# Altium PCB PCI Express_16765X6890_64PIN_Low profile.PCBDOC (part 2 of 5)
Units mm, origin at the board's own origin, x right, y up, seen from the top; angles counter-clockwise.
Board outline 167.65 x 68.9 mm, 6 copper layers (TopLayer, AGround_Layer, InternalPlane1, Power_Layer, Ground_Layer, BottomLayer), stack 1.141 mm thick; 897 components, 648 nets, 2942 pads, 321 vias.
Unrouted connection lines stored in the file: 1996.
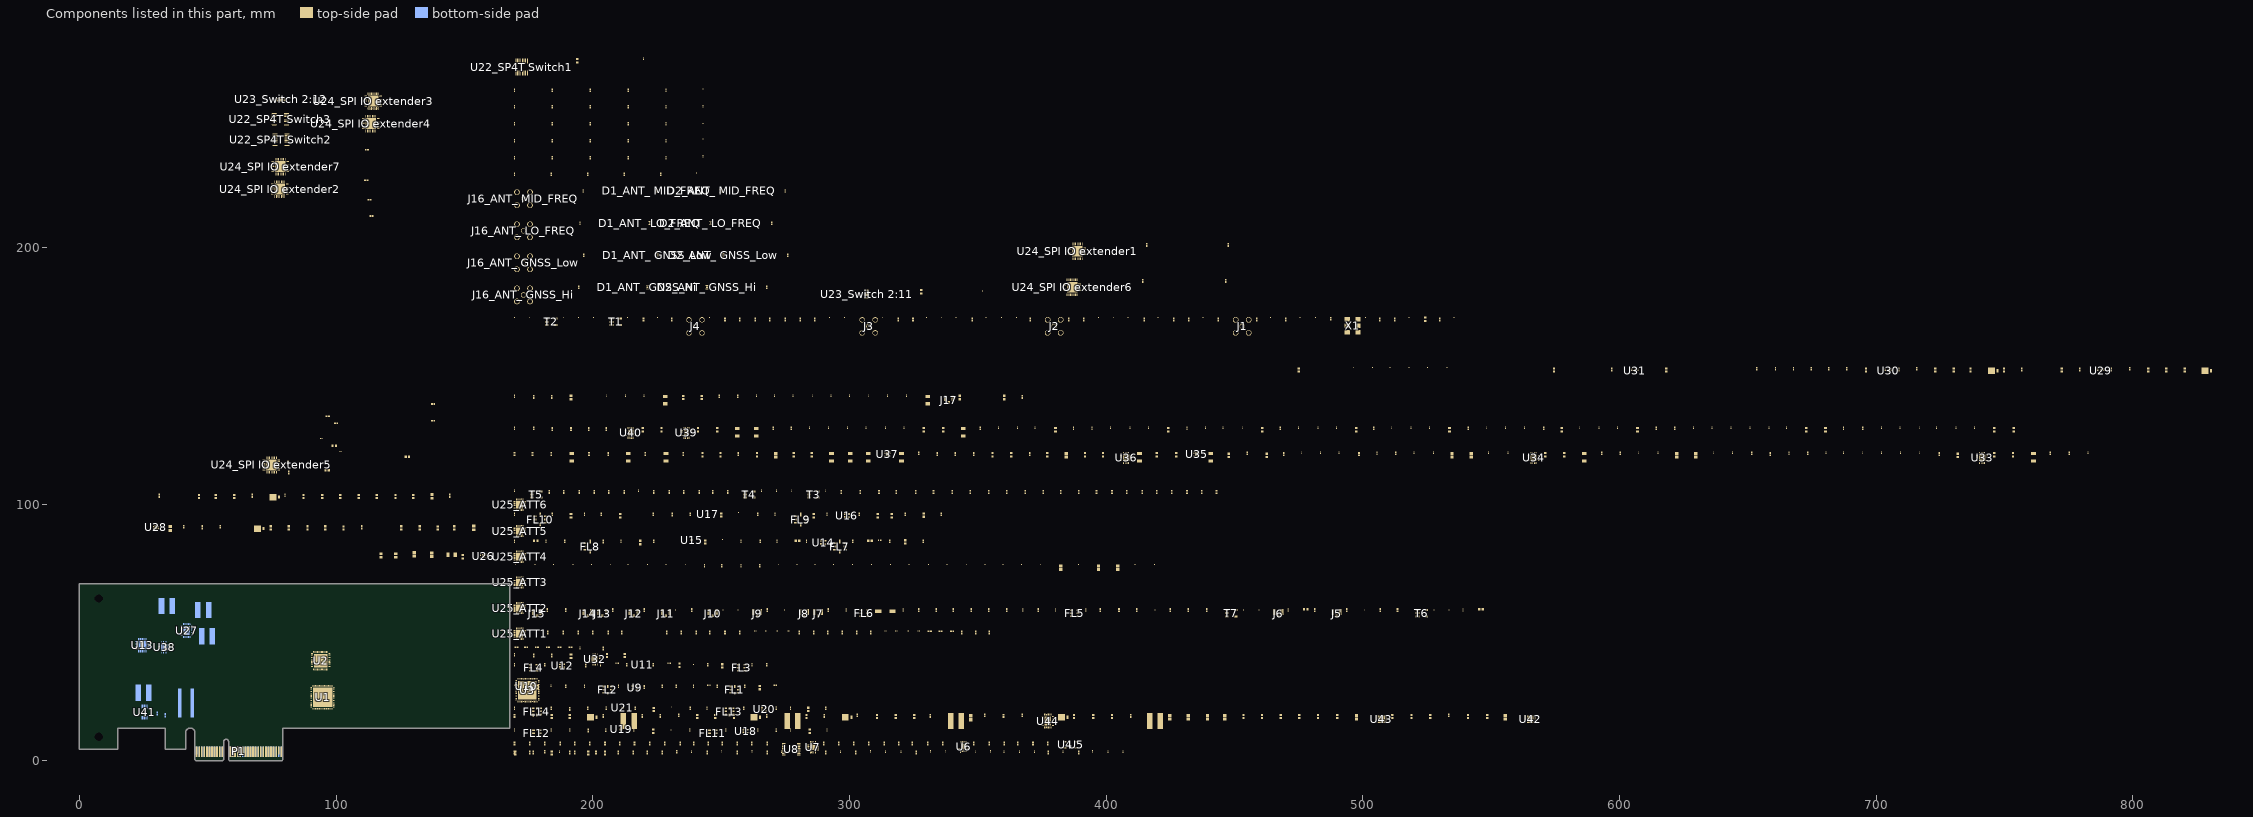
[diagram p4: the components of this part, seen from the top]

## Components (designator, comment, footprint, x,y, rotation, side; value= is the part's Value field where it differs from the comment) (continued)
C284 "10µF" "CAP 0805/2012 RF" 542.249,119 r90 top
C285 "0.1µF" "CAP 0201/0603 RF" 548.999,120 r90 top
C286 "0.1µF" "CAP 0201/0603 RF" 556.499,120 r90 top
C287 "10µF" "CAP 0402/1005 RF" 505.499,119.75 r90 top
C288 "10µF" "CAP 0402/1005 RF" 512.749,119.75 r90 top
C289 "0.1µF" "CAP 0201/0603 RF" 475.999,120 r90 top
C290 "0.1µF" "CAP 0201/0603 RF" 483.499,120 r90 top
C291 "0.1µF" "CAP 0201/0603 RF" 490.749,120 r90 top
C292 "4.7µF" "CAP 0603/1608" 462.499,119 r90 top
C293 "1nF" "CAP 0402/1005 RF" 454.999,119.75 r90 top
C294 "4.7µF" "CAP 0603/1608" 447.749,119 r90 top
C295 "4.7µF" "CAP 0603/1608 RF" 419.749,119.25 r90 top
C296 "4.7µF" "CAP 0603/1608 RF" 427.249,119.25 r90 top
C297 "4.7 µF" "CAP 0603/1608 RF" 355.749,119.25 r90 top
C298 "2200pF" "CAP 0603/1608 RF" 362.999,119.25 r90 top
C299 "1µF" "CAP 0603/1608 RF" 376.999,119.25 r90 top
C300 "10µF" "CAP 0805/2012 RF" 384.499,119 r90 top
C301 "4.7µF" "CAP 0603/1608 RF" 391.749,119.25 r90 top
C302 "4.7µF" "CAP 0603/1608 RF" 398.749,119.25 r90 top
C303 "1nF" "CAP 0402/1005 RF" 326.999,119.75 r90 top
C304 "4.7 µF" "CAP 0603/1608 RF" 242.749,119.25 r90 top
C305 "2200pF" "CAP 0603/1608 RF" 249.749,119.25 r90 top
C306 "1µF" "CAP 0603/1608 RF" 263.999,119.25 r90 top
C307 "10µF" "CAP 0805/2012 RF" 271.249,119 r90 top
C308 "4.7µF" "CAP 0603/1608 RF" 278.249,119.25 r90 top
C309 "4.7µF" "CAP 0603/1608 RF" 285.249,119.25 r90 top
C310 "2.2µF" "CAP 0603/1608" 360.249,141.5 r90 top
C311 "2.2µF" "CAP 0603/1608" 342.999,141.5 r90 top
C312 "0.1µF" "CAP 0201/0603 RF" 263.749,142.25 r90 top
C313 "0.1µF" "CAP 0201/0603 RF" 270.749,142.25 r90 top
C314 "0.1µF" "CAP 0201/0603 RF" 277.999,142.25 r90 top
C315 "0.1µF" "CAP 0201/0603 RF" 285.499,142.25 r90 top
C316 "0.1µF" "CAP 0201/0603 RF" 292.749,142.25 r90 top
C317 "0.1µF" "CAP 0201/0603 RF" 299.999,142.25 r90 top
C318 "0.1µF" "CAP 0201/0603 RF" 307.499,142.25 r90 top
C319 "0.1µF" "CAP 0201/0603 RF" 314.749,142.25 r90 top
C320 "0.1µF" "CAP 0201/0603 RF" 322.249,142.25 r90 top
C321 "4.7µF" "CAP 0603/1608 RF" 235.249,141.5 r90 top
C322 "4.7µF" "CAP 0603/1608 RF" 242.499,141.5 r90 top
C323 "10µF" "CAP 0402/1005 RF" 249.249,142 r90 top
C324 "10µF" "CAP 0402/1005 RF" 256.499,142 r90 top
C325 "0.1µF" "CAP 0201/0603 RF" 205.249,142.25 r90 top
C326 "0.1µF" "CAP 0201/0603 RF" 212.749,142.25 r90 top
C327 "0.1µF" "CAP 0201/0603 RF" 219.999,142.25 r90 top
C328 "4.7µF" "CAP 0603/1608" 191.499,141.5 r90 top
C329 "1nF" "CAP 0402/1005 RF" 169.499,142 r90 top
C330 "0.1µF" "CAP 0201/0603 RF" 701.998,129.75 r90 top
C331 "0.1µF" "CAP 0201/0603 RF" 709.248,129.75 r90 top
C332 "0.1µF" "CAP 0201/0603 RF" 716.748,129.75 r90 top
C333 "0.1µF" "CAP 0201/0603 RF" 723.498,129.75 r90 top
C334 "0.1µF" "CAP 0201/0603 RF" 730.998,129.75 r90 top
C335 "0.1µF" "CAP 0201/0603 RF" 738.248,129.75 r90 top
C336 "10µF" "CAP 0402/1005 RF" 687.248,129.5 r90 top
C337 "10µF" "CAP 0402/1005 RF" 694.748,129.5 r90 top
C338 "0.1µF" "CAP 0201/0603 RF" 628.749,129.75 r90 top
C339 "0.1µF" "CAP 0201/0603 RF" 635.999,129.75 r90 top
C340 "0.1µF" "CAP 0201/0603 RF" 643.499,129.75 r90 top
C341 "0.1µF" "CAP 0201/0603 RF" 650.748,129.75 r90 top
C342 "0.1µF" "CAP 0201/0603 RF" 658.248,129.75 r90 top
C343 "0.1µF" "CAP 0201/0603 RF" 664.998,129.75 r90 top
C344 "10µF" "CAP 0402/1005 RF" 614.249,129.5 r90 top
C345 "10µF" "CAP 0402/1005 RF" 621.499,129.5 r90 top
C346 "0.1µF" "CAP 0201/0603 RF" 584.499,129.75 r90 top
C347 "0.1µF" "CAP 0201/0603 RF" 591.999,129.75 r90 top
C348 "0.1µF" "CAP 0201/0603 RF" 599.249,129.75 r90 top
C349 "0.1µF" "CAP 0201/0603 RF" 548.249,129.75 r90 top
C350 "0.1µF" "CAP 0201/0603 RF" 555.499,129.75 r90 top
C351 "0.1µF" "CAP 0201/0603 RF" 562.999,129.75 r90 top
C352 "10µF" "CAP 0402/1005 RF" 570.499,129.5 r90 top
C353 "10µF" "CAP 0402/1005 RF" 540.999,129.5 r90 top
C354 "0.1µF" "CAP 0201/0603 RF" 511.249,129.75 r90 top
C355 "0.1µF" "CAP 0201/0603 RF" 518.749,129.75 r90 top
C356 "0.1µF" "CAP 0201/0603 RF" 525.999,129.75 r90 top
C357 "10µF" "CAP 0402/1005 RF" 504.249,129.5 r90 top
C358 "0.1µF" "CAP 0201/0603 RF" 474.999,129.75 r90 top
C359 "0.1µF" "CAP 0201/0603 RF" 482.499,129.75 r90 top
C360 "0.1µF" "CAP 0201/0603 RF" 489.749,129.75 r90 top
C361 "10µF" "CAP 0402/1005 RF" 467.749,129.5 r90 top
C362 "0.1µF" "CAP 0201/0603 RF" 438.749,129.75 r90 top
C363 "0.1µF" "CAP 0201/0603 RF" 445.499,129.75 r90 top
C364 "0.1µF" "CAP 0201/0603 RF" 452.999,129.75 r90 top
C365 "10µF" "CAP 0402/1005 RF" 431.499,129.5 r90 top
C366 "0.1µF" "CAP 0201/0603 RF" 401.749,129.75 r90 top
C367 "0.1µF" "CAP 0201/0603 RF" 409.249,129.75 r90 top
C368 "0.1µF" "CAP 0201/0603 RF" 416.499,129.75 r90 top
C369 "10µF" "CAP 0402/1005 RF" 387.249,129.5 r90 top
C370 "100pF" "CAP 0402/1005 RF" 394.499,129.5 r90 top
C371 "0.1µF" "CAP 0201/0603 RF" 357.999,129.75 r90 top
C372 "0.1µF" "CAP 0201/0603 RF" 365.499,129.75 r90 top
C373 "0.1µF" "CAP 0201/0603 RF" 372.249,129.75 r90 top
C374 "10µF" "CAP 0402/1005 RF" 350.999,129.5 r90 top
C375 "0.1µF" "CAP 0201/0603 RF" 306.499,129.75 r90 top
C376 "0.1µF" "CAP 0201/0603 RF" 313.999,129.75 r90 top
C377 "0.1µF" "CAP 0201/0603 RF" 321.249,129.75 r90 top
C378 "10µF" "CAP 0402/1005 RF" 277.249,129.5 r90 top
C379 "0.1µF" "CAP 0201/0603 RF" 284.499,129.75 r90 top
C380 "0.1µF" "CAP 0201/0603 RF" 291.749,129.75 r90 top
C381 "0.1µF" "CAP 0201/0603 RF" 299.249,129.75 r90 top
C382 "10µF" "CAP 0402/1005 RF" 270.249,129.5 r90 top
C383 "4.7µF" "CAP 0603/1608 RF" 240.999,129 r90 top
C384 "4.7µF" "CAP 0603/1608 RF" 248.499,129 r90 top
C385 "4.7µF" "CAP 0603/1608 RF" 219.499,129 r90 top
C386 "4.7µF" "CAP 0603/1608 RF" 226.749,129 r90 top
C387 "1nF" "CAP 0402/1005 RF" 176.999,129.5 r90 top
C388 "1nF" "CAP 0402/1005 RF" 169.499,129.5 r90 top
C389 "4.7 µF" "CAP 0603/1608 RF" 526.249,17.25 r90 top
C390 "1.5nF" "CAP 0402/1005 RF" 533.499,17.75 r90 top
C391 "4.7 µF" "CAP 0603/1608 RF" 548.499,17.25 r90 top
C392 "10µF" "CAP 0805/2012 RF" 555.499,17 r90 top
C393 "0.01µF" "CAP 0603/1608 RF" 511.499,17.25 r90 top
C394 "4.7 µF" "CAP 0603/1608 RF" 467.999,17.25 r90 top
C395 "680pF" "CAP 0603/1608 RF" 475.249,17.25 r90 top
C396 "1µF" "CAP 0603/1608 RF" 489.999,17.25 r90 top
C397 "10µF" "CAP 0805/2012 RF" 497.499,17 r90 top
C398 "0.01µF" "CAP 0603/1608 RF" 453.499,17.25 r90 top
C399 "4.7µF" "CAP 0805/2012 RF" 424.749,17 r90 top
C400 "4.7µF" "CAP 0805/2012 RF" 431.999,17 r90 top
C401 "4.7µF" "CAP 0805/2012 RF" 439.499,17 r90 top
C402 "4.7µF" "CAP 0805/2012 RF" 446.249,17 r90 top
C403 "4.7 µF" "CAP 0603/1608 RF" 387.499,17.25 r90 top
C404 "4.7 µF" "CAP 0603/1608 RF" 394.999,17.25 r90 top
C405 "4.7 µF" "CAP 0603/1608 RF" 402.249,17.25 r90 top
C406 "22pF" "CAP 0402/1005 RF" 367.249,17.75 r90 top
C407 "1µF" "CAP 0402/1005 RF" 352.749,17.75 r90 top
C408 "22pF" "CAP 0402/1005 RF" 302.999,17.75 r90 top
C409 "4.7 µF" "CAP 0603/1608 RF" 310.749,17.25 r90 top
C410 "4.7 µF" "CAP 0603/1608 RF" 317.999,17.25 r90 top
C411 "4.7 µF" "CAP 0603/1608 RF" 325.249,17.25 r90 top
C412 "50nF" "CAP 0603/1608 RF" 283.249,17.25 r90 top
C413 "22pF" "CAP 0402/1005 RF" 233.499,17.75 r90 top
C414 "4.7 µF" "CAP 0603/1608 RF" 240.749,17.25 r90 top
C415 "4.7 µF" "CAP 0603/1608 RF" 247.749,17.25 r90 top
C416 "4.7 µF" "CAP 0603/1608 RF" 254.999,17.25 r90 top
C417 "22pF" "CAP 0402/1005 RF" 176.749,17.75 r90 top
C418 "4.7 µF" "CAP 0603/1608 RF" 183.999,17.25 r90 top
C419 "4.7 µF" "CAP 0603/1608 RF" 190.999,17.25 r90 top
Conn1 "PCIE" "RES 0402/1005 RF" 203.999,43.75 r90 top
Conn2 "FMC" "RES 0201/0603" 194.999,44 r90 top
"D1_ANT_ GNSS_Hi" "MADP-011029-14150T" ODS-1415 221.249,184.499 r90 top (schematic designator D1)
"D1_ANT_ GNSS_Low" "MADP-011029-14150T" ODS-1415 225.249,196.999 r90 top (schematic designator D1)
"D1_ANT_ LO_FREQ" "MADP-011029-14150T" ODS-1415 222.249,209.499 r90 top (schematic designator D1)
"D1_ANT_ MID_FREQ" "MADP-011029-14150T" ODS-1415 224.749,221.999 r90 top (schematic designator D1)
"D2_ANT_ GNSS_Hi" "MADL-011021-14150T" ODS-1415 244.499,184.499 r90 top (schematic designator D2)
"D2_ANT_ GNSS_Low" "MADL-011021-14150T" ODS-1415 250.749,196.999 r90 top (schematic designator D2)
"D2_ANT_ LO_FREQ" "MADL-011021-14150T" ODS-1415 245.999,209.499 r90 top (schematic designator D2)
"D2_ANT_ MID_FREQ" "MADL-011021-14150T" ODS-1415 249.999,221.999 r90 top (schematic designator D2)
D3 "MBRM140T3" "CASE 457" 71.075,90.499 r0 top
D4 "MBRM140T3" "CASE 457" 77.075,102.749 r0 top
D5 "MBRM140T3" "CASE 457" 829.748,151.999 r0 top
D6 "MBRM140T3" "CASE 457" 746.498,151.999 r0 top
D7 "MBRM140T3" "CASE 457" 384.249,17 r0 top
D8 "MBRM140T3" "CASE 457" 299.999,17 r0 top
D9 "MBRM140T3" "CASE 457" 264.499,17 r0 top
D10 "MBRM140T3" "CASE 457" 200.749,17 r0 top
FB1 "120Ohm" "FER 0402/1005" 442.999,104.75 r90 top
FB2 "120Ohm" "FER 0402/1005" 431.499,104.75 r90 top
FB3 "120Ohm" "FER 0402/1005" 437.249,104.75 r90 top
FB4 "120Ohm" "FER 0402/1005" 419.749,104.75 r90 top
FB5 "120Ohm" "FER 0402/1005" 425.499,104.75 r90 top
FB6 "120Ohm" "FER 0402/1005" 413.999,104.75 r90 top
FB7 "120Ohm" "FER 0402/1005" 407.999,104.75 r90 top
FB8 "120Ohm" "FER 0402/1005" 402.249,104.75 r90 top
FB9 "120Ohm" "FER 0402/1005" 396.249,104.75 r90 top
FB10 "120Ohm" "FER 0402/1005" 389.249,104.75 r90 top
FB11 "120Ohm" "FER 0402/1005" 375.499,104.75 r90 top
FB12 "120Ohm" "FER 0402/1005" 382.249,104.75 r90 top
FB13 "120Ohm" "FER 0402/1005" 361.249,104.75 r90 top
FB14 "120Ohm" "FER 0402/1005" 368.499,104.75 r90 top
FB15 "120Ohm" "FER 0402/1005" 354.249,104.75 r90 top
FB16 "120Ohm" "FER 0402/1005" 346.999,104.75 r90 top
FB17 "120Ohm" "FER 0402/1005" 332.749,104.75 r90 top
FB18 "120Ohm" "FER 0402/1005" 339.999,104.75 r90 top
FB19 "120Ohm" "FER 0402/1005" 325.749,104.75 r90 top
FB20 "120Ohm" "FER 0402/1005" 318.249,104.75 r90 top
FB21 "120Ohm" "FER 0402/1005" 311.499,104.75 r90 top
FB22 "120Ohm" "FER 0402/1005" 304.249,104.75 r90 top
FB23 "120Ohm" "FER 0402/1005" 296.749,104.75 r90 top
FB24 "10Ohm" "FER 0402/1005" 596.999,152.499 r90 top
FB25 "120Ohm" "CAP 1206/3216" 761.248,118.25 r90 top
FB26 "120Ohm" "CAP 1206/3216" 586.249,118.25 r90 top
FB27 "120Ohm" "CAP 1206/3216" 440.749,118.25 r90 top
FB28 "120Ohm" "CAP 1206/3216" 412.999,118.25 r90 top
FB29 "120Ohm" "CAP 1206/3216" 320.249,118.25 r90 top
FB30 "120Ohm" "CAP 1206/3216" 307.249,118.25 r90 top
FB31 "120Ohm" "CAP 1206/3216" 300.249,118.25 r90 top
FB32 "120Ohm" "CAP 1206/3216" 292.999,118.25 r90 top
FB33 "120Ohm" "CAP 1206/3216" 228.499,118.25 r90 top
FB34 "10Ohm" "FER 0402/1005" 235.249,119.5 r90 top
FB35 "120Ohm" "CAP 1206/3216" 213.749,118.25 r90 top
FB36 "10Ohm" "FER 0402/1005" 220.499,119.5 r90 top
FB37 "120Ohm" "CAP 1206/3216" 191.749,118.25 r90 top
FB38 "10Ohm" "FER 0402/1005" 198.499,119.5 r90 top
FB39 "10Ohm" "FER 0402/1005" 183.749,119.5 r90 top
FB40 "10Ohm" "FER 0402/1005" 176.499,119.5 r90 top
FB41 "10Ohm" "FER 0402/1005" 169.499,119.5 r90 top
FB42 "120Ohm" "CAP 1206/3216" 330.499,140.5 r90 top
FB43 "33Ohm" "CAP 1206/3216" 228.249,140.5 r90 top
FB44 "220Ohm" "FER 0603/1608" 745.998,129 r90 top
FB45 "220Ohm" "FER 0603/1608" 753.498,129 r90 top
FB46 "220Ohm" "FER 0603/1608" 672.748,129 r90 top
FB47 "220Ohm" "FER 0603/1608" 680.248,129 r90 top
FB48 "220Ohm" "FER 0603/1608" 606.999,129 r90 top
FB49 "220Ohm" "FER 0603/1608" 577.499,129 r90 top
FB50 "220Ohm" "FER 0603/1608" 533.749,129 r90 top
FB51 "220Ohm" "FER 0603/1608" 497.499,129 r90 top
FB52 "220Ohm" "FER 0603/1608" 460.749,129 r90 top
FB53 "220Ohm" "FER 0603/1608" 424.249,129 r90 top
FB54 "220Ohm" "FER 0603/1608" 380.249,129 r90 top
FB55 "120Ohm" "CAP 1206/3216" 344.249,128 r90 top
FB56 "220Ohm" "FER 0603/1608" 336.499,129 r90 top
FB57 "220Ohm" "FER 0603/1608" 328.999,129 r90 top
FB58 "120Ohm" "CAP 1206/3216" 263.749,128 r90 top
FB59 "120Ohm" "CAP 1206/3216" 256.249,128 r90 top
FL1 "TFS 1225C" "TFS 1225C" 255.249,27.75 r0 top
FL2 "TFS 1225C" "TFS 1225C" 205.749,27.75 r0 top
FL3 "TFS1575Z" TFS1176 257.999,36.25 r0 top
FL4 "TFS1575Z" TFS1176 176.999,36.25 r0 top
FL5 "TFS1575Z" TFS1176 387.749,57.5 r0 top
FL6 "TFS1176" TFS1176 305.749,57.5 r0 top
FL7 "TFS 110A" "5.0x5.0 LCC" 296.249,83.5 r0 top
FL8 "TFS 110A" "5.0x5.0 LCC" 198.999,83.5 r0 top
FL9 "TFS 420D" "5.0x5.0 LCC" 280.999,94 r0 top
FL10 "TFS 420D" "5.0x5.0 LCC" 179.499,94 r0 top
FL11 "TFS1176" TFS1176 246.749,10.75 r0 top
FL12 "TFS1176" TFS1176 178.249,10.75 r0 top
FL13 "TFS1204A" "TFS 1225C" 253.249,19.25 r0 top
FL14 "TFS1204A" "TFS 1225C" 178.249,19.25 r0 top
J1 "5-1814400-1" TECO-5-1814400-1_V 452.999,169.249 r0 top
J2 "5-1814400-1" TECO-5-1814400-1_V 379.749,169.249 r0 top
J3 "5-1814832-1" TECO-5-1814832-1_V 307.499,169.249 r0 top
J4 "5-1814832-1" TECO-5-1814832-1_V 239.999,169.249 r0 top
J5 "1909763-1" TECO-1909763-1_V 489.749,58 r0 top
J6 "1909763-1" TECO-1909763-1_V 466.999,58 r0 top
J7 "1909763-1" TECO-1909763-1_V 287.749,58 r0 top
J8 "1909763-1" TECO-1909763-1_V 282.249,58 r0 top
J9 "1909763-1" TECO-1909763-1_V 263.999,58 r0 top
J10 "1909763-1" TECO-1909763-1_V 246.749,58 r0 top
J11 "1909763-1" TECO-1909763-1_V 228.499,58 r0 top
J12 "1909763-1" TECO-1909763-1_V 215.999,58 r0 top
J13 "1909763-1" TECO-1909763-1_V 203.749,58 r0 top
J14 "1909763-1" TECO-1909763-1_V 197.999,58 r0 top
J15 "1909763-1" TECO-1909763-1_V 178.249,58 r0 top
"J16_ANT_ GNSS_Hi" "5-1814400-1" TECO-5-1814400-1_V 172.999,181.499 r90 top (schematic designator J16)
"J16_ANT_ GNSS_Low" "5-1814400-1" TECO-5-1814400-1_V 172.999,193.999 r90 top (schematic designator J16)
"J16_ANT_ LO_FREQ" "5-1814400-1" TECO-5-1814400-1_V 172.999,206.499 r90 top (schematic designator J16)
"J16_ANT_ MID_FREQ" "5-1814400-1" TECO-5-1814400-1_V 172.999,218.999 r90 top (schematic designator J16)
J17 "DNP" TECO-1909763-1_V 338.749,141.25 r0 top
L1 "8.2nH 0402 SRF 3.6GHz" "IND 0402/1005 RF WW" 245.249,29.5 r0 top
L2 "9.4nH" "IND 0402/1005 RF WW" 169.999,29.5 r0 top
L3 "8.2nH 0402 SRF 3.6GHz" "IND 0402/1005 RF WW" 229.749,38 r0 top
L4 "8.2nH" "IND 0402/1005 RF WW" 209.499,38 r0 top
L5 "5.6nH" "FER 0603/1608" 545.999,59 r0 top
L6 "8.4nH" "FER 0603/1608" 477.749,59 r0 top
L7 "82nH" "IND 0402/1005 RF WW" 311.749,86 r0 top
L8 "450nH" "FER 0603/1608" 307.999,85.75 r0 top
L9 "450nH" "FER 0603/1608" 279.749,85.75 r0 top
L10 "450nH" "FER 0603/1608" 218.499,85 r90 top
L11 "450nH" "FER 0603/1608" 177.749,85.75 r0 top
L12 "82nH SFR: 2GHz" "FER 0603/1608" 316.499,95.5 r90 top
L13 "390nH 0603" "FER 0603/1608" 310.999,95.5 r90 top
L14 "390nH 0603" "FER 0603/1608" 285.999,95.5 r90 top
L15 "390nH 0603" "FER 0603/1608" 210.749,95.5 r90 top
L16 "390nH 0603" "FER 0603/1608" 191.499,95.5 r90 top
L17 "8.2nH 0402 SRF 3.6GHz" "IND 0402/1005 RF WW" 271.499,12 r90 top
L18 "9.4nH" "IND 0402/1005 RF WW" 204.999,12 r90 top
L19 "8.2nH 0402 SRF 3.6GHz" "IND 0402/1005 RF WW" 271.499,20.5 r90 top
L20 "9.4nH" "IND 0402/1005 RF WW" 205.249,20.5 r90 top
L21 "1µH" "RES 1206/3216" 145,80.25 r0 top
L22 "CDRH5D28-8R2" CDRH5D28 49.75,48.5 r180 bottom
L23 "15 µH" "FER 0805/2012" 35.325,90.499 r90 top
L24 "CDRH5D28-4R2" CDRH5D28 48.25,58.75 r180 bottom
L25 "CDRH5D28-8R2" CDRH5D28 34.05,60.25 r180 bottom
L26 "CDRH5D28-4R2" CDRH5D28 25,26.5 r180 bottom
L27 "CDRH5D28-8R2" CDRH5D28 418.999,15.5 r0 top
L28 "15 µH" "FER 0805/2012" 347.249,16.75 r90 top
L29 "CDRH5D28-4R2" CDRH5D28 341.499,15.5 r0 top
L30 "CDRH5D28-8R2" CDRH5D28 277.749,15.5 r0 top
L31 "CDRH5D28-8R2" CDRH5D28 213.999,15.5 r0 top
P1 "PCIeX4-GF-2D-1000-1K-O64" PCIeX4-GF-2D-1000-1K-O64 55.15,3.5 r0 top locked
R1 "10k" "RES 0402/1005 RF" 170.249,44.25 r0 top
R2 "10k" "RES 0402/1005 RF" 173.999,44.25 r0 top
R3 "10k" "RES 0402/1005 RF" 178.249,44.25 r0 top
R4 "10k" "RES 0402/1005 RF" 182.499,44.25 r0 top
R5 "10k" "RES 0402/1005 RF" 186.999,44.25 r0 top
R6 "10k" "RES 0402/1005 RF" 191.249,44.25 r0 top
R7 "10k" "RES 0402/1005 RF" 331.249,50.5 r0 top
R8 "10k" "RES 0402/1005 RF" 335.499,50.5 r0 top
R9 "10k" "RES 0402/1005 RF" 339.999,50.5 r0 top
R10 "10k" "RES 0402/1005 RF" 343.749,50 r90 top
R11 "10k" "RES 0402/1005 RF" 349.249,50 r90 top
R12 "10k" "RES 0402/1005 RF" 354.499,50 r90 top
R17 "10k" "RES 0402/1005 RF" 280.499,50 r90 top
R18 "10k" "RES 0402/1005 RF" 285.999,50 r90 top
R19 "10k" "RES 0402/1005 RF" 291.499,50 r90 top
R20 "10k" "RES 0402/1005 RF" 297.249,50 r90 top
R21 "10k" "RES 0402/1005 RF" 302.749,50 r90 top
R22 "10k" "RES 0402/1005 RF" 308.249,50 r90 top
R23 "10k" "RES 0402/1005 RF" 228.749,50 r90 top
R24 "10k" "RES 0402/1005 RF" 234.499,50 r90 top
R25 "10k" "RES 0402/1005 RF" 240.249,50 r90 top
R26 "10k" "RES 0402/1005 RF" 245.499,50 r90 top
R27 "10k" "RES 0402/1005 RF" 251.499,50 r90 top
R28 "10k" "RES 0402/1005 RF" 257.249,50 r90 top
R29 "10k" "RES 0402/1005 RF" 371.499,6.75 r90 top
R30 "10k" "RES 0402/1005 RF" 377.249,6.75 r90 top
R31 "0R 0402" "RES 0402/1005 RF" 360.249,6.75 r90 top
R32 "0R 0402" "RES 0402/1005 RF" 365.499,6.75 r90 top
R33 "0R 0402" "RES 0402/1005 RF" 354.499,6.75 r90 top
R34 "0R 0402" "RES 0402/1005 RF" 348.499,6.75 r90 top
R35 "0R 0402" "RES 0402/1005 RF" 336.249,6.75 r90 top
R36 "10k" "RES 0402/1005 RF" 289.999,6.75 r90 top
R37 "10k" "RES 0402/1005 RF" 295.749,6.75 r90 top
R38 "10k" "RES 0402/1005 RF" 301.749,6.75 r90 top
R39 "10k" "RES 0402/1005 RF" 307.499,6.75 r90 top
R40 "10k" "RES 0402/1005 RF" 313.499,6.75 r90 top
R41 "10k" "RES 0402/1005 RF" 319.249,6.75 r90 top
R42 "10k" "RES 0402/1005 RF" 324.499,6.75 r90 top
R43 "10k" "RES 0402/1005 RF" 330.499,6.75 r90 top
R44 "10k" "RES 0402/1005 RF" 182.499,50 r90 top
R45 "10k" "RES 0402/1005 RF" 188.499,50 r90 top
R46 "10k" "RES 0402/1005 RF" 194.249,50 r90 top
R47 "10k" "RES 0402/1005 RF" 199.999,50 r90 top
R48 "10k" "RES 0402/1005 RF" 205.999,50 r90 top
R49 "10k" "RES 0402/1005 RF" 211.249,50 r90 top
R50 "10k" "RES 0402/1005 RF" 239.249,6.75 r90 top
R51 "10k" "RES 0402/1005 RF" 244.999,6.75 r90 top
R52 "10k" "RES 0402/1005 RF" 250.499,6.75 r90 top
R53 "10k" "RES 0402/1005 RF" 256.249,6.75 r90 top
R54 "10k" "RES 0402/1005 RF" 261.999,6.75 r90 top
R55 "10k" "RES 0402/1005 RF" 267.999,6.75 r90 top
R56 "10k" "RES 0402/1005 RF" 204.749,6.75 r90 top
R57 "10k" "RES 0402/1005 RF" 210.499,6.75 r90 top
R58 "10k" "RES 0402/1005 RF" 216.249,6.75 r90 top
R59 "10k" "RES 0402/1005 RF" 222.249,6.75 r90 top
R60 "10k" "RES 0402/1005 RF" 227.999,6.75 r90 top
R61 "10k" "RES 0402/1005 RF" 233.999,6.75 r90 top
R62 "10k" "RES 0402/1005 RF" 169.499,6.75 r90 top
R63 "10k" "RES 0402/1005 RF" 175.499,6.75 r90 top
R64 "10k" "RES 0402/1005 RF" 181.249,6.75 r90 top
R65 "10k" "RES 0402/1005 RF" 187.249,6.75 r90 top
R66 "10k" "RES 0402/1005 RF" 192.999,6.75 r90 top
R67 "10k" "RES 0402/1005 RF" 198.749,6.75 r90 top
R68 "15R" "RES 0603/1608" 264.999,28.5 r90 top
R69 "DNP" "RES 0402/1005 RF" 219.999,28.75 r90 top value="0R 0402"
R70 "15R" "RES 0603/1608" 250.499,37 r90 top
R71 "DNP" "RES 0402/1005 RF" 197.249,37.25 r90 top value="0R 0402"
R72 "0R 0402" "RES 0402/1005 RF" 190.999,3.25 r90 top
R73 "0R 0402" "RES 0402/1005 RF" 176.749,3.25 r90 top
R74 "51R 0402" "RES 0402/1005 RF" 529.999,171.999 r90 top
R75 "0R 0402" "RES 0402/1005 RF" 506.499,171.999 r90 top
R76 "0R 0402" "RES 0402/1005 RF" 512.499,171.999 r90 top
R77 "0R 0402" "RES 0402/1005 RF" 443.749,171.999 r90 top
R78 "0R 0402" "RES 0402/1005 RF" 469.999,171.999 r90 top
R79 "DNP" "RES 0402/1005 RF" 426.249,171.999 r90 top value=270
R80 "DNP" "RES 0402/1005 RF" 432.249,171.999 r90 top value=51
R81 "51R 0402" "RES 0402/1005 RF" 458.749,171.999 r90 top
R82 "100" "RES 0402/1005 RF" 414.749,171.999 r90 top
R83 "DNP" "RES 0402/1005 RF" 385.499,171.999 r90 top value=270
R84 "DNP" "RES 0402/1005 RF" 391.249,171.999 r90 top value=51
R85 "0R 0402" "RES 0402/1005 RF" 370.499,171.999 r90 top
R86 "0R 0402" "RES 0402/1005 RF" 347.749,171.999 r90 top
R87 "DNP" "RES 0402/1005 RF" 318.999,171.999 r90 top value=270
R88 "DNP" "RES 0402/1005 RF" 324.749,171.999 r90 top value=51
R89 "100" "RES 0402/1005 RF" 280.749,171.999 r90 top
R90 "DNP" "RES 0402/1005 RF" 274.999,171.999 r90 top value=270
R91 "DNP" "RES 0402/1005 RF" 263.249,171.999 r90 top value=51
R92 "0R 0402" "RES 0402/1005 RF" 251.499,171.999 r90 top
R93 "0R 0402" "RES 0402/1005 RF" 286.499,171.999 r90 top
R94 "DNP" "RES 0402/1005 RF" 268.999,171.999 r90 top value=51
R95 "DNP" "RES 0402/1005 RF" 257.249,171.999 r90 top value=100
R96 "DNP" "RES 0402/1005 RF" 230.749,171.999 r90 top value=51
R97 "0R 0402" "RES 0402/1005 RF" 219.749,171.999 r90 top
R98 "10" "RES 0201/0603" 371.999,3.5 r90 top
R99 "0R 0402" "RES 0402/1005 RF" 377.499,3.25 r90 top
R100 "10" "RES 0201/0603" 383.249,3.5 r90 top
R101 "0R 0402" "RES 0402/1005 RF" 389.249,3.25 r90 top
R102 "49.9" "RES 0201/0603" 360.249,3.5 r90 top
R103 "10" "RES 0201/0603" 366.249,3.5 r90 top
R104 "49.9" "RES 0201/0603" 343.249,3.5 r90 top
R105 "100" "RES 0402/1005 RF" 325.999,3.25 r90 top
R106 "49.9" "RES 0201/0603" 313.999,3.5 r90 top
R107 "10" "RES 0201/0603" 319.999,3.5 r90 top
R108 "10" "RES 0201/0603" 285.249,3.5 r90 top
R109 "0R 0402" "RES 0402/1005 RF" 290.749,3.25 r90 top
R110 "10" "RES 0201/0603" 296.499,3.5 r90 top
R111 "0R 0402" "RES 0402/1005 RF" 302.499,3.25 r90 top
R112 "4.99" "RES 0402/1005 RF" 256.249,3.25 r90 top
R113 "100" "RES 0402/1005 RF" 267.999,3.25 r90 top
R114 "24.9" "RES 0402/1005 RF" 244.499,3.25 r90 top
R115 "100" "RES 0201/0603" 238.499,3.5 r90 top
R116 "24.9" "RES 0402/1005 RF" 226.999,3.25 r90 top
R117 "4.99" "RES 0402/1005 RF" 221.249,3.25 r90 top
R118 "24.9" "RES 0402/1005 RF" 215.749,3.25 r90 top
R119 "24.9" "RES 0402/1005 RF" 209.999,3.25 r90 top
R120 "4.99" "RES 0402/1005 RF" 201.25,3.25 r90 top
R121 "24.9" "RES 0402/1005 RF" 192.999,3.25 r90 top
R122 "100" "RES 0201/0603" 186.999,3.5 r90 top
R123 "24.9" "RES 0402/1005 RF" 175.499,3.25 r90 top
R124 "4.99" "RES 0402/1005 RF" 169.499,3.25 r90 top
R125 "10k" "RES 0402/1005 RF" 223.749,104.75 r90 top
R126 "10k" "RES 0402/1005 RF" 229.749,104.75 r90 top
R127 "10k" "RES 0402/1005 RF" 235.499,104.75 r90 top
R128 "10k" "RES 0402/1005 RF" 241.499,104.75 r90 top
R129 "10k" "RES 0402/1005 RF" 246.749,104.75 r90 top
R130 "10k" "RES 0402/1005 RF" 252.499,104.75 r90 top
R131 "10k" "RES 0402/1005 RF" 182.999,104.75 r90 top
R132 "10k" "RES 0402/1005 RF" 188.749,104.75 r90 top
R133 "10k" "RES 0402/1005 RF" 194.749,104.75 r90 top
R134 "10k" "RES 0402/1005 RF" 200.499,104.75 r90 top
R135 "10k" "RES 0402/1005 RF" 206.249,104.75 r90 top
R136 "10k" "RES 0402/1005 RF" 212.249,104.75 r90 top
R137 "1K" "RES 0402/1005 RF" 513.499,58.75 r90 top
R138 "200" "RES 0402/1005 RF" 506.749,58.75 r90 top
R139 "1K" "RES 0402/1005 RF" 493.749,58.75 r90 top
R140 "0R 0402" "RES 0402/1005 RF" 481.249,58.75 r90 top
R141 "1K" "RES 0402/1005 RF" 439.249,58.75 r90 top
R142 "0R 0402" "RES 0402/1005 RF" 431.999,58.75 r90 top
R143 "200" "RES 0402/1005 RF" 424.999,58.75 r90 top
R144 "1K" "RES 0402/1005 RF" 411.999,58.75 r90 top
R145 "15k" "RES 0402/1005 RF" 404.999,58.75 r90 top
R146 "0R 0402" "RES 0402/1005 RF" 397.749,58.75 r90 top
R147 "0R 0402" "RES 0402/1005 RF" 373.499,58.75 r90 top
R148 "0R 0402" "RES 0402/1005 RF" 361.249,58.75 r90 top
R149 "0R 0402" "RES 0402/1005 RF" 354.249,58.75 r90 top
R150 "0R 0402" "RES 0402/1005 RF" 347.499,58.75 r90 top
R151 "0R 0402" "RES 0402/1005 RF" 340.499,58.75 r90 top
R152 "0R 0402" "RES 0402/1005 RF" 333.749,58.75 r90 top
R153 "0R 0402" "RES 0402/1005 RF" 326.999,58.75 r90 top
R154 "0R 0402" "RES 0402/1005 RF" 291.749,58.75 r90 top
R155 "0R 0402" "RES 0402/1005 RF" 267.999,58.75 r90 top
R156 "0R 0402" "RES 0402/1005 RF" 238.499,58.75 r90 top
R157 "0R 0402" "RES 0402/1005 RF" 219.999,58.75 r90 top
R158 "0R 0402" "RES 0402/1005 RF" 207.749,58.75 r90 top
R159 "0R 0402" "RES 0402/1005 RF" 189.499,58.75 r90 top
R160 "0R 0402" "RES 0402/1005 RF" 182.249,58.75 r90 top
R161 "0R 0402" "RES 0402/1005 RF" 169.499,58.75 r90 top
R162 "15R" "RES 0603/1608" 321.749,85.25 r90 top
R163 "DNP" "RES 0402/1005 RF" 203.999,85.5 r90 top value="0R 0402"
R164 "15R" "RES 0603/1608" 328.999,95.75 r90 top
R165 "DNP" "RES 0402/1005 RF" 230.999,96 r90 top value="0R 0402"
R166 "15R" "RES 0603/1608" 284.499,11.5 r90 top
R167 "DNP" "RES 0402/1005 RF" 198.249,11.75 r90 top value="0R 0402"
R168 "15R" "RES 0603/1608" 283.999,20 r90 top
R169 "DNP" "RES 0402/1005 RF" 190.999,20.25 r90 top value="0R 0402"
"R170_SPI IO extender1" "10k" "RES 0402/1005 RF" 447.499,200.999 r90 top (schematic designator R170)
"R170_SPI IO extender2" "10k" "RES 0402/1005 RF" 96.75,134.25 r0 top (schematic designator R170)
"R170_SPI IO extender3" "10k" "RES 0402/1005 RF" 137.75,132.5 r0 top (schematic designator R170)
"R170_SPI IO extender4" "10k" "RES 0402/1005 RF" 100,131.5 r0 top (schematic designator R170)
"R170_SPI IO extender5" "10k" "RES 0402/1005 RF" 81.5,112.25 r90 top (schematic designator R170)
"R170_SPI IO extender6" "10k" "RES 0402/1005 RF" 446.499,186.999 r90 top (schematic designator R170)
"R170_SPI IO extender7" "10k" "RES 0402/1005 RF" 137.75,139 r0 top (schematic designator R170)
"R171_SPI IO extender1" "10k" "RES 0402/1005 RF" 415.749,200.999 r90 top (schematic designator R171)
"R171_SPI IO extender2" "10k" "RES 0402/1005 RF" 112,238 r0 top (schematic designator R171)
"R171_SPI IO extender3" "10k" "RES 0402/1005 RF" 111.75,226.25 r0 top (schematic designator R171)
"R171_SPI IO extender4" "10k" "RES 0402/1005 RF" 113,218.5 r0 top (schematic designator R171)
"R171_SPI IO extender5" "10k" "RES 0402/1005 RF" 81.25,116.25 r90 top (schematic designator R171)
"R171_SPI IO extender6" "10k" "RES 0402/1005 RF" 414.249,186.999 r90 top (schematic designator R171)
"R171_SPI IO extender7" "10k" "RES 0402/1005 RF" 113.75,212.25 r0 top (schematic designator R171)
R172 "220k" "RES 0603/1608 RF" 139.575,90.749 r90 top
R173 "25k" "RES 0402/1005 RF" 110.075,90.999 r90 top
R174 "39.2k" "RES 0603/1608 RF" 102.825,90.749 r90 top
R175 "10k" "RES 0402/1005 RF" 47.825,90.999 r90 top
R176 "12.5k" "RES 0402/1005 RF" 144.325,103.249 r90 top
R177 "220k" "RES 0603/1608 RF" 123.075,102.999 r90 top
R178 "10k" "RES 0402/1005 RF" 67.325,103.249 r90 top
R179 "39.2k" "RES 0603/1608 RF" 60.325,102.999 r90 top
R180 "38.75k" "RES 0402/1005 RF" 31.075,103.249 r90 top
R181 "18.2k (1MHz)" "RES 0402/1005 RF" 791.498,152.499 r90 top
R182 "10k" "RES 0402/1005 RF" 779.248,152.499 r90 top
R183 "21.25k" "RES 0402/1005 RF" 756.748,152.499 r90 top
R184 "10k" "RES 0402/1005 RF" 708.748,152.499 r90 top
R185 "100k" "RES 0402/1005 RF" 183.999,41 r90 top
R186 "24,9k" "RES 0402/1005 RF" 176.999,41 r90 top
R187 "100k" "RES 0402/1005 RF" 724.498,119.5 r90 top
R188 "24,9k" "RES 0402/1005 RF" 658.748,119.5 r90 top
R189 "4.99k" "RES 0402/1005 RF" 498.499,119.5 r90 top
R190 "3.32" "RES 0402/1005 RF" 469.249,119.5 r90 top
R191 "4.99k" "RES 0402/1005 RF" 370.249,119.5 r90 top
R192 "4.99k" "RES 0402/1005 RF" 348.499,119.5 r90 top
R193 "3.32" "RES 0402/1005 RF" 341.249,119.5 r90 top
R194 "3.32" "RES 0402/1005 RF" 334.249,119.5 r90 top
R195 "4.99k" "RES 0402/1005 RF" 256.749,119.5 r90 top
R196 "3.32" "RES 0402/1005 RF" 205.999,119.5 r90 top
R197 "1K" "RES 0402/1005 RF" 367.249,141.75 r90 top
R198 "100k" "RES 0402/1005 RF" 183.999,141.75 r90 top
R199 "38.3k" "RES 0402/1005 RF" 176.999,141.75 r90 top
R200 "100k" "RES 0402/1005 RF" 205.249,129.25 r90 top
R201 "100k" "RES 0402/1005 RF" 198.499,129.25 r90 top
R202 "17.8k" "RES 0402/1005 RF" 191.499,129.25 r90 top
R203 "38.3k" "RES 0402/1005 RF" 184.249,129.25 r90 top
R204 "0.005" "RES 4320 Wide" 41.5,22.5 r180 bottom
R205 "10k" "RES 0402/1005 RF" 30.25,18.5 r90 bottom
R206 "10k" "RES 0402/1005 RF" 33.5,17.75 r90 bottom
R207 "1.8k" "RES 0603/1608 RF" 540.999,17.25 r90 top
R208 "1k" "RES 0603/1608 RF" 518.999,17.25 r90 top
R209 "4k" "RES 0603/1608 RF" 482.499,17.25 r90 top
R210 "1k" "RES 0603/1608 RF" 460.749,17.25 r90 top
R211 "35k" "RES 0402/1005 RF" 409.499,17.5 r90 top
R212 "10k" "RES 0402/1005 RF" 359.999,17.5 r90 top
R213 "21.25k" "RES 0402/1005 RF" 331.499,17.5 r90 top
R214 "10k" "RES 0402/1005 RF" 290.249,17.5 r90 top
R215 "35k" "RES 0402/1005 RF" 267.749,17.5 r90 top
R216 "18.2k (1MHz)" "RES 0402/1005 RF" 226.249,17.5 r90 top
R217 "10k" "RES 0402/1005 RF" 219.249,17.5 r90 top
R218 "58.75k" "RES 0402/1005 RF" 203.999,17.5 r90 top
R219 "10k" "RES 0402/1005 RF" 169.499,17.5 r90 top
T1 "MABAES0060" MABA-007159-000000 208.999,170.999 r0 top
T2 "MABAES0060" MABA-007159-000000 183.749,170.999 r0 top
T3 "MABA-007159-000000" MABA-007159-000000 285.999,103.75 r0 top
T4 "MABA-007159-000000" MABA-007159-000000 260.999,103.75 r0 top
T5 "MABA-007159-000000" MABA-007159-000000 177.999,103.75 r0 top
T6 "MABAES0060" MABA-007159-000000 522.999,57.5 r0 top
T7 "MABAES0060" MABA-007159-000000 448.749,57.5 r0 top
TP1 "Test Point" "TE TP 0805" 311.249,58.25 r0 top
TP2 "Test Point" "TE TP 0805" 316.749,58.25 r0 top
U1 "AD9690" AD9690 94.75,24.75 r0 top
U2 "LTC2122" LTC2122 94,39 r0 top
U3 "LMK04610" LMK04208 174.499,27.5 r0 top
U4 "TXB0304RSVR" RSV0016A 383.999,6.25 r0 top
U5 "TXB0304RSVR" RSV0016A 388.249,6.25 r0 top
U6 "SN74LV4T125RGYR" RGY0014A_V 344.499,5.5 r0 top
U7 "PCA9546ARGVRG4" RGV16-2160X2160TP 285.749,5.25 r0 top
U8 "SC18IS602B" SOT403-1 277.249,4.5 r0 top
U9 "BGA616" INF-SOT343_V 216.249,28.5 r0 top
U10 "BGA855N6" TSNP-6-10-FP 173.999,29 r0 top
U11 "BGA524N6" TSNP-6-10-FP 219.249,37.5 r0 top
U12 "BGA616" INF-SOT343_V 187.999,37 r0 top
U13 "MAX2771" "MAX2771 T2855-8" 24.55,45 r180 bottom
U14 "BGA616" INF-SOT343_V 289.749,85 r0 top
U15 "BGA729N6" TSNP-6-10-FP 238.499,86 r90 top
U16 "BGA616" INF-SOT343_V 298.999,95.5 r0 top
U17 "BGA729N6" TSNP-6-10-FP 244.749,96 r0 top
U18 "BGA616" INF-SOT343_V 259.499,11.5 r0 top
U19 "BGA855N6" TSNP-6-10-FP 210.999,12.25 r90 top
U20 "BGA616" INF-SOT343_V 266.749,20 r0 top
U21 "BGA855N6" TSNP-6-10-FP 211.499,20.75 r90 top
"U22_SP4T Switch1" "HMC241AQS16" HMC241A 172.249,270.249 r90 top (schematic designator U22)
"U22_SP4T Switch2" "HMC241AQS16" HMC241A 78.5,242 r0 top (schematic designator U22)
"U22_SP4T Switch3" "HMC241AQS16" HMC241A 78.25,250 r0 top (schematic designator U22)
"U23_Switch 2:11" "ADG918" CP-8-13 306.749,181.749 r90 top (schematic designator U23)
"U23_Switch 2:12" "ADG918" CP-8-13 78.5,257.75 r0 top (schematic designator U23)
"U24_SPI IO extender1" "MCP23017-E/ML" QFN-ML28_N 388.749,198.499 r90 top (schematic designator U24)
"U24_SPI IO extender2" "MCP23017-E/ML" QFN-ML28_N 78.05,222.75 r0 top (schematic designator U24)
"U24_SPI IO extender3" "MCP23017-E/ML" QFN-ML28_N 114.437,257 r0 top (schematic designator U24)
"U24_SPI IO extender4" "MCP23017-E/ML" QFN-ML28_N 113.5,248.25 r0 top (schematic designator U24)
"U24_SPI IO extender5" "MCP23017-E/ML" QFN-ML28_N 74.749,115.249 r90 top (schematic designator U24)
"U24_SPI IO extender6" "MCP23017-E/ML" QFN-ML28_N 386.749,184.499 r90 top (schematic designator U24)
"U24_SPI IO extender7" "MCP23017-E/ML" QFN-ML28_N 78.25,231.5 r0 top (schematic designator U24)
U25_ATT1 "HMC472ALP4E" HMC472ALP4E 171.499,49.5 r90 top (schematic designator U25)
U25_ATT2 "HMC472ALP4E" HMC472ALP4E 171.499,59.5 r90 top (schematic designator U25)
U25_ATT3 "HMC472ALP4E" HMC472ALP4E 171.499,69.5 r90 top (schematic designator U25)
U25_ATT4 "HMC472ALP4E" HMC472ALP4E 171.499,79.5 r90 top (schematic designator U25)
U25_ATT5 "HMC472ALP4E" HMC472ALP4E 171.499,89.5 r90 top (schematic designator U25)
U25_ATT6 "HMC472ALP4E" HMC472ALP4E 171.499,99.75 r90 top (schematic designator U25)
U26 "ADP125ACPZ-R7" ADI-CP-8-8_V 157.324,79.749 r0 top
U27 "LT3504EUFD#PBF" LT-UFD-28_N 41.775,50.75 r180 bottom
U28 "ADP125ACPZ-R7" ADI-CP-8-8_V 29.825,90.999 r0 top
U29 "LP5900SD-2.5" SDB06A 787.498,151.999 r0 top
U30 "LP5900SD-2.5" SDB06A 704.748,151.999 r0 top
U31 "LP5900SD-2.8" SDB06A 605.999,151.999 r0 top
U32 "ADP1741ACPZ-R7" ADI-CP-16-13_N 200.749,39.5 r0 top
U33 "ADP1741ACPZ-R7" ADI-CP-16-13_N 741.248,118 r0 top
U34 "ADP1741ACPZ-R7" ADI-CP-16-13_N 566.499,118 r0 top
U35 "ADP125ACPZ-R7" ADI-CP-8-8_V 435.249,119.5 r0 top
U36 "ADP1741ACPZ-R7" ADI-CP-16-13_N 407.749,118 r0 top
U37 "ADP125ACPZ-R7" ADI-CP-8-8_V 314.749,119.5 r0 top
U38 "ADP1741ACPZ-R7" ADI-CP-16-13_N 33.075,44.25 r180 bottom
U39 "ADP1753ACPZ-R7" CP-16-4_N 236.499,127.75 r0 top
U40 "ADP1753ACPZ-R7" CP-16-4_N 214.749,127.75 r0 top
U41 "INA226" DGS0010A 25.325,19 r90 bottom
U42 "LP3878SD-ADJ/NOPB" SDC08A 565.249,16.25 r0 top
U43 "LP3878SD-ADJ/NOPB" SDC08A 507.249,16.25 r0 top
U44 "LT3504EUFD#PBF" LT-UFD-28_N 377.249,15.5 r0 top
X1 "VG-4513CA" VG-4513CA 495.999,169.499 r0 top

## Footprints (in the part's own frame and the unit in brackets; to place one, negate y for a bottom-side part, rotate by r counter-clockwise, add the part's x,y. Pads: shape width x height; smd on the part's side, far side on the other; paste and mask are expansions set on the pad)
"5.0x5.0 LCC" [mm] "5.0x5.0 LCC 8-Leads, Body 5,00x5,00mm, Pitch 1,27mm, IPC Medium Density"
  rect 1.3x0.65 smd: 1(-2.05,1.27) 2(-2.05,0) 3(-2.05,-1.27) 5(2.05,-1.27) 6(2.05,0) 7(2.05,1.27)
  rect 0.65x1.3 smd: 4(0,-2.05)
  rect 0.65x1.5 smd: 8(0,1.95)
  silkscreen extent -3.42,-2.65 2.65,2.65, body extent -2.52,-2.52 2.52,2.52, height 1.35
AD9690 [mm] "AD9690 9 x 9mm, 64 pin, 0.5 pitch 7.6sq Pad"
  oval 0.6x0.3 smd: 1(-4.4,3.75) 2(-4.4,3.25) 3(-4.4,2.75) 4(-4.4,2.25) 5(-4.4,1.75) 6(-4.4,1.25) 7(-4.4,0.75) 8(-4.4,0.25) 9(-4.4,-0.25) 10(-4.4,-0.75) 11(-4.4,-1.25) 12(-4.4,-1.75) 13(-4.4,-2.25) 14(-4.4,-2.75) 15(-4.4,-3.25) 16(-4.4,-3.75) 33(4.4,-3.75) 34(4.4,-3.25) 35(4.4,-2.75) 36(4.4,-2.25) 37(4.4,-1.75) 38(4.4,-1.25) 39(4.4,-0.75) 40(4.4,-0.25) 41(4.4,0.25) 42(4.4,0.75) 43(4.4,1.25) 44(4.4,1.75) 45(4.4,2.25) 46(4.4,2.75) 47(4.4,3.25) 48(4.4,3.75)
  oval 0.3x0.6 smd: 17(-3.75,-4.4) 18(-3.25,-4.4) 19(-2.75,-4.4) 20(-2.25,-4.4) 21(-1.75,-4.4) 22(-1.25,-4.4) 23(-0.75,-4.4) 24(-0.25,-4.4) 25(0.25,-4.4) 26(0.75,-4.4) 27(1.25,-4.4) 28(1.75,-4.4) 29(2.25,-4.4) 30(2.75,-4.4) 31(3.25,-4.4) 32(3.75,-4.4) 49(3.75,4.4) 50(3.25,4.4) 51(2.75,4.4) 52(2.25,4.4) 53(1.75,4.4) 54(1.25,4.4) 55(0.75,4.4) 56(0.25,4.4) 57(-0.25,4.4) 58(-0.75,4.4) 59(-1.25,4.4) 60(-1.75,4.4) 61(-2.25,4.4) 62(-2.75,4.4) 63(-3.25,4.4) 64(-3.75,4.4)
  rect 7.6x7.6 smd: 65(0,0)
  silkscreen extent -5.47,-4.7 4.7,4.7, body extent -4.57,-4.57 4.57,4.57, height 0.8
ADI-CP-8-8_V [mm] "SON, 8-Leads, Body 2x2mm, Pitch 0.5mm, Thermal Pad 1.6x1mm"
  rect 0.35x0.3 smd: 1(-1,0.75) 2(-1,0.25) 3(-1,-0.25) 4(-1,-0.75) 5(1,-0.75) 6(1,-0.25) 7(1,0.25) 8(1,0.75)
  rect 1.1x1.6 smd: 9(0,0)
  silkscreen extent -1.45,0.95 -1.35,1.05, body extent -1,-1 1,1, height 0.65
ADI-CP-16-13_N [mm] "QFN, 16-Leads, Body 4x4mm, Pitch 0.65mm, Thermal Pad 2.5x2.5mm, IPC Medium Density"
  oval 0.7x0.25 smd: 1(-2,0.975) 2(-2,0.325) 3(-2,-0.325) 4(-2,-0.975) 9(2,-0.975) 10(2,-0.325) 11(2,0.325) 12(2,0.975)
  oval 0.25x0.7 smd: 5(-0.975,-2) 6(-0.325,-2) 7(0.325,-2) 8(0.975,-2) 13(0.975,2) 14(0.325,2) 15(-0.325,2) 16(-0.975,2)
  rect 2.5x2.5 smd: 17(0,0)
  silkscreen extent -2.92,-2.15 2.15,2.15, body extent -2,-2 2,2, height 1
"CAP 0201/0603" [mm]
  rect 0.4x0.35 smd: 1(-0.31,0) 2(0.31,0)
  silkscreen extent -0.67,-0.33 0.67,0.33, body extent -0.3,-0.15 0.3,0.15, height 0.3
"CAP 0201/0603 RF" [mm]
  rect 0.3x0.32 smd: 1(-0.26,0) 2(0.26,0)
  silkscreen extent -0.58,-0.33 0.58,0.33, body extent -0.3,-0.15 0.3,0.15, height 0.3
"CAP 0402/1005 RF" [mm]
  rect 0.55x0.54 smd: 1(-0.39,0) 2(0.39,0)
  silkscreen extent -0.87,-0.45 0.87,0.45, body extent -0.5,-0.26 0.5,0.26, height 0.52
"CAP 0603/1608" [mm]
  rect 0.9x1 smd: 1(-0.675,0) 2(0.675,0)
  silkscreen extent -1.4,-0.7 1.4,0.7, body extent -0.8,-0.41 0.8,0.41, height 0.82
"CAP 0603/1608 RF" [mm]
  rect 0.8x0.9 smd: 1(-0.625,0) 2(0.625,0)
  silkscreen extent -1.2,-0.63 1.2,0.63, body extent -0.8,-0.41 0.8,0.41, height 0.82
"CAP 0805/2012 RF" [mm]
  rect 1.1x1.3 smd: 1(-0.7,0) 2(0.7,0)
  silkscreen extent -1.43,-0.82 1.43,0.82, body extent -1,-0.64 1,0.64, height 1.26
"CAP 1206/3216" [mm] "Chip Capacitor, 2-Leads, Body 3.25x1.60mm, IPC Medium Density"
  rect 1.3x1.8 smd: 1(-1.45,0) 2(1.45,0)
  silkscreen extent -2.37,-1.12 2.37,1.12, body extent -1.6,-0.81 1.6,0.81, height 1.62
"CASE 457" [mil] "CASE 457-04, MBRM140T1G"
  rect 105.12x100 smd: 1(-65.06,0)
  rect 30x50 smd: 2(27.5,0)
  silkscreen extent -126,-61 -122,-57, body extent -118,-52 27,53, height 43
CDRH5D28 [mm] "CDRH5D28 , Precision Wire Wound Inductor, 2-Leads, Body 6,00x6,00mm, IPC High Density"
  rect 2.15x6.3 smd: 1(-2.075,0) 2(2.075,0)
  silkscreen extent -0.45,-3 0.45,3, body extent -3.1,-3.15 3.1,3.15, height 3.1
CP-8-13 [mm] "CP-8-13, 8-Leads, Body 3,00x3,00mm, Pitch 0,50mm, Thermal Pad 0,00x0,00mm, IPC Medium Density"
  rect 0.8x0.25 smd: 1(-1.4,0.75) 2(-1.4,0.25) 3(-1.4,-0.25) 4(-1.4,-0.75) 5(1.4,-0.75) 6(1.4,-0.25) 7(1.4,0.25) 8(1.4,0.75)
  rect 1.45x1.74 smd: 9(0,0)
  silkscreen extent -2.1,-1.65 1.65,1.7, body extent -1.6,-1.5 1.6,1.5, height 0.7
CP-16-4_N [mm] "QFN, 16-Leads, Body 4x4mm, Pitch 0.65mm, Thermal Pad 2.1x2.1mm, IPC Medium Density"
  oval 0.95x0.3 smd: 1(-1.875,0.975) 2(-1.875,0.325) 3(-1.875,-0.325) 4(-1.875,-0.975) 9(1.875,-0.975) 10(1.875,-0.325) 11(1.875,0.325) 12(1.875,0.975)
  oval 0.3x0.95 smd: 5(-0.975,-1.875) 6(-0.325,-1.875) 7(0.325,-1.875) 8(0.975,-1.875) 13(0.975,1.875) 14(0.325,1.875) 15(-0.325,1.875) 16(-0.975,1.875)
  rect 2.1x2.1 smd: 17(0,0)
  silkscreen extent -2.92,-2.15 2.15,2.15, body extent -2,-2 2,2, height 1
DGS0010A [mm] "INA226, 10-Leads, Body 3,00x3,00mm, Pitch 0,50mm, IPC Medium Density"
  oval 1.45x0.3 smd: 1(-2.2,1) 2(-2.2,0.5) 3(-2.2,0) 4(-2.2,-0.5) 5(-2.2,-1) 6(2.2,-1) 7(2.2,-0.5) 8(2.2,0) 9(2.2,0.5) 10(2.2,1)
  silkscreen extent -2.32,-1.5 1.1,1.83, body extent -2.45,-1.5 2.45,1.5, height 1
"FER 0402/1005" [mm] "Chip Ferrite, 2-Leads, Body 1.02x0.51mm, IPC Medium Density"
  rect 0.6x0.64 smd: 1(-0.44,0) 2(0.44,0)
  silkscreen extent -1,-0.5 1,0.5, body extent -0.5,-0.26 0.5,0.26, height 0.52
"FER 0603/1608" [mm]
  rect 0.9x1 smd: 1(-0.675,0) 2(0.675,0)
  silkscreen extent -1.4,-0.7 1.4,0.7, body extent -0.8,-0.41 0.8,0.41, height 0.82
"FER 0805/2012" [mm]
  rect 1.3x1.4 smd: 1(-0.8,0) 2(0.8,0)
  silkscreen extent -1.7,-0.9 1.7,0.9, body extent -1,-0.64 1,0.64, height 1.26
HMC241A [mm] "HMC241A, SOP, 16-Leads, Body 5,00x3,00mm, Pitch 0,64mm, IPC Medium Density"
  oval 2x0.3 smd: 1(-2.35,2.24) 2(-2.35,1.6) 3(-2.35,0.96) 4(-2.35,0.32) 5(-2.35,-0.32) 6(-2.35,-0.96) 7(-2.35,-1.6) 8(-2.35,-2.24) 9(2.35,-2.24) 10(2.35,-1.6) 11(2.35,-0.96) 12(2.35,-0.32) 13(2.35,0.32) 14(2.35,0.96) 15(2.35,1.6) 16(2.35,2.24)
  silkscreen extent -2.47,-2.5 1.1,3.06, body extent -3.1,-2.5 3.1,2.5, height 1.75
HMC472ALP4E [mm] "HMC472ALP4E, QFN, 24-Leads, Body 4,00x4,00mm, Pitch 0,50mm, Thermal Pad 2,80x2,80mm, IPC Medium Density"
  oval 0.8x0.3 smd: 1(-2,1.25) 2(-2,0.75) 3(-2,0.25) 4(-2,-0.25) 5(-2,-0.75) 6(-2,-1.25) 13(2,-1.25) 14(2,-0.75) 15(2,-0.25) 16(2,0.25) 17(2,0.75) 18(2,1.25)
  oval 0.3x0.8 smd: 7(-1.25,-2) 8(-0.75,-2) 9(-0.25,-2) 10(0.25,-2) 11(0.75,-2) 12(1.25,-2) 19(1.25,2) 20(0.75,2) 21(0.25,2) 22(-0.25,2) 23(-0.75,2) 24(-1.25,2)
  rect 2.8x2.8 smd: 25(0,0)
  silkscreen extent -2.82,-2.05 2.05,2.05, body extent -2.05,-2.05 2.05,2.05, height 1
"IND 0402/1005 RF WW" [mm]
  rect 0.48x0.54 smd: 1(-0.44,0) 2(0.44,0)
  silkscreen extent -0.87,-0.45 0.87,0.45, body extent -0.5,-0.29 0.5,0.29, height 0.51
INF-SOT343_V [mm] "SOT343, 4-Leads, Body 2x1.25 mm"
  rect 0.8x0.6 smd: 1(-0.8,0.65) 3(0.8,-0.65) 4(0.8,0.65)
  rect 0.8x0.9 smd: 2(-0.8,-0.5)
  silkscreen extent -0.85,1.3 -0.75,1.4, body extent -0.63,-1 0.63,1, height 1
LMK04208 [mm] "LMK04208, PQFN, 64-Leads, Body 9,00x9,00mm, Pitch 0,50mm, Thermal Pad 7,20x7,20mm, IPC Medium Density"
  oval 0.6x0.25 smd: 1(-4.4,3.75) 2(-4.4,3.25) 3(-4.4,2.75) 4(-4.4,2.25) 5(-4.4,1.75) 6(-4.4,1.25) 7(-4.4,0.75) 8(-4.4,0.25) 9(-4.4,-0.25) 10(-4.4,-0.75) 11(-4.4,-1.25) 12(-4.4,-1.75) 13(-4.4,-2.25) 14(-4.4,-2.75) 15(-4.4,-3.25) 16(-4.4,-3.75) 33(4.4,-3.75) 34(4.4,-3.25) 35(4.4,-2.75) 36(4.4,-2.25) 37(4.4,-1.75) 38(4.4,-1.25) 39(4.4,-0.75) 40(4.4,-0.25) 41(4.4,0.25) 42(4.4,0.75) 43(4.4,1.25) 44(4.4,1.75) 45(4.4,2.25) 46(4.4,2.75) 47(4.4,3.25) 48(4.4,3.75)
  oval 0.25x0.6 smd: 17(-3.75,-4.4) 18(-3.25,-4.4) 19(-2.75,-4.4) 20(-2.25,-4.4) 21(-1.75,-4.4) 22(-1.25,-4.4) 23(-0.75,-4.4) 24(-0.25,-4.4) 25(0.25,-4.4) 26(0.75,-4.4) 27(1.25,-4.4) 28(1.75,-4.4) 29(2.25,-4.4) 30(2.75,-4.4) 31(3.25,-4.4) 32(3.75,-4.4) 49(3.75,4.4) 50(3.25,4.4) 51(2.75,4.4) 52(2.25,4.4) 53(1.75,4.4) 54(1.25,4.4) 55(0.75,4.4) 56(0.25,4.4) 57(-0.25,4.4) 58(-0.75,4.4) 59(-1.25,4.4) 60(-1.75,4.4) 61(-2.25,4.4) 62(-2.75,4.4) 63(-3.25,4.4) 64(-3.75,4.4)
  rect 7.2x7.2 smd: 65(0,0)
  silkscreen extent -5.32,-4.55 4.55,4.55, body extent -4.55,-4.55 4.55,4.55, height 0.8
LT-UFD-28_N [mm] "QFN, 28-Leads, Body 5.1x4.1mm, Pitch 0.5mm, Thermal Pad 3.65x2.65mm, IPC Medium Density"
  oval 0.75x0.25 smd: 1(-1.975,1.75) 2(-1.975,1.25) 3(-1.975,0.75) 4(-1.975,0.25) 5(-1.975,-0.25) 6(-1.975,-0.75) 7(-1.975,-1.25) 8(-1.975,-1.75) 15(1.975,-1.75) 16(1.975,-1.25) 17(1.975,-0.75) 18(1.975,-0.25) 19(1.975,0.25) 20(1.975,0.75) 21(1.975,1.25) 22(1.975,1.75)
  oval 0.25x0.75 smd: 9(-1.25,-2.475) 10(-0.75,-2.475) 11(-0.25,-2.475) 12(0.25,-2.475) 13(0.75,-2.475) 14(1.25,-2.475) 23(1.25,2.475) 24(0.75,2.475) 25(0.25,2.475) 26(-0.25,2.475) 27(-0.75,2.475) 28(-1.25,2.475)
  rect 2.65x3.65 smd: 29(0,0)
  silkscreen extent -2.98,-2.7 2.2,2.7, body extent -2.05,-2.55 2.05,2.55, height 0.8
LTC2122 [mm] "LTC2122, QFN, 48-Leads, Body 7,00x7,00mm, Pitch 0,50mm, Thermal Pad 5,15x5,15mm, IPC Medium Density"
  oval 0.7x0.25 smd: 1(-3.4,2.75) 2(-3.4,2.25) 3(-3.4,1.75) 4(-3.4,1.25) 5(-3.4,0.75) 6(-3.4,0.25) 7(-3.4,-0.25) 8(-3.4,-0.75) 9(-3.4,-1.25) 10(-3.4,-1.75) 11(-3.4,-2.25) 12(-3.4,-2.75) 25(3.4,-2.75) 26(3.4,-2.25) 27(3.4,-1.75) 28(3.4,-1.25) 29(3.4,-0.75) 30(3.4,-0.25) 31(3.4,0.25) 32(3.4,0.75) 33(3.4,1.25) 34(3.4,1.75) 35(3.4,2.25) 36(3.4,2.75)
  oval 0.25x0.7 smd: 13(-2.75,-3.4) 14(-2.25,-3.4) 15(-1.75,-3.4) 16(-1.25,-3.4) 17(-0.75,-3.4) 18(-0.25,-3.4) 19(0.25,-3.4) 20(0.75,-3.4) 21(1.25,-3.4) 22(1.75,-3.4) 23(2.25,-3.4) 24(2.75,-3.4) 37(2.75,3.4) 38(2.25,3.4) 39(1.75,3.4) 40(1.25,3.4) 41(0.75,3.4) 42(0.25,3.4) 43(-0.25,3.4) 44(-0.75,3.4) 45(-1.25,3.4) 46(-1.75,3.4) 47(-2.25,3.4) 48(-2.75,3.4)
  rect 5.15x5.15 smd: 49(0,0)
  silkscreen extent -4.42,-3.65 3.65,3.65, body extent -3.7,-3.7 3.7,3.7, height 0.8
MABA-007159-000000 [mm] "MABA-007159-000000, 5-Leads, Body 3,80x4,83mm, Pitch 1,25mm, IPC Medium Density"
  rect 1.4x0.76 smd: 1(-1.715,-1.25) 2(-1.715,0) 3(-1.715,1.25) 4(1.715,1.25) 5(1.715,-1.25)
  silkscreen extent -2.92,-2.03 2.79,1.9, body extent -2.69,-1.9 2.69,1.9, height 3.24